# Altium PCB PCB_LED_Board_v2.0.PcbDoc
Units mil, origin at the board's own origin, x right, y up, seen from the top; angles counter-clockwise.
Board outline 1496.06 x 590.55 mil, 3 copper layers (Aluminium, Dielectric, Copper Layer), stack 124.257 mil thick; 4 components, 5 nets, 13 pads, 0 vias.
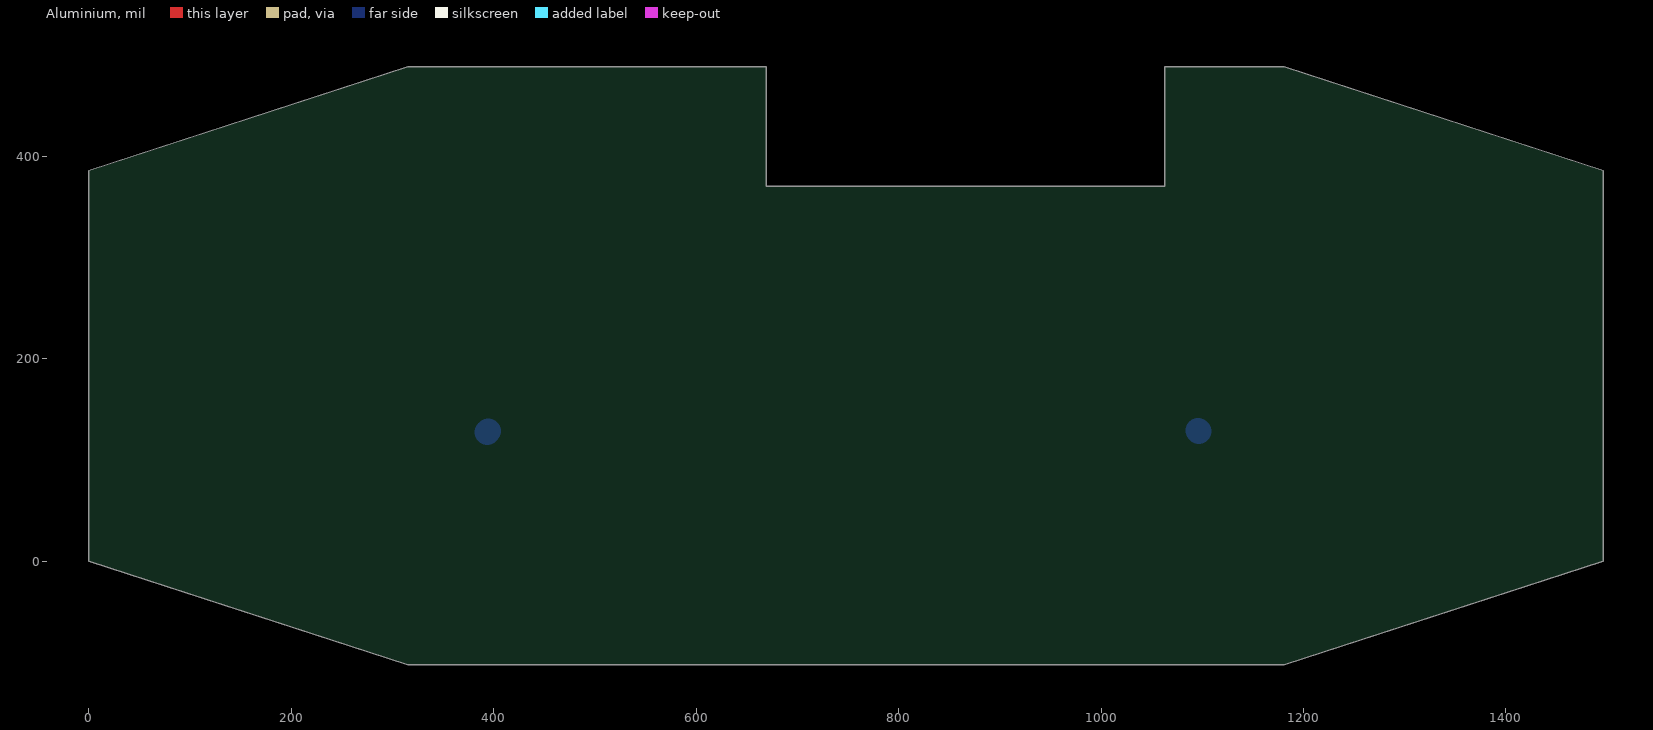
[diagram p0: Aluminium view]
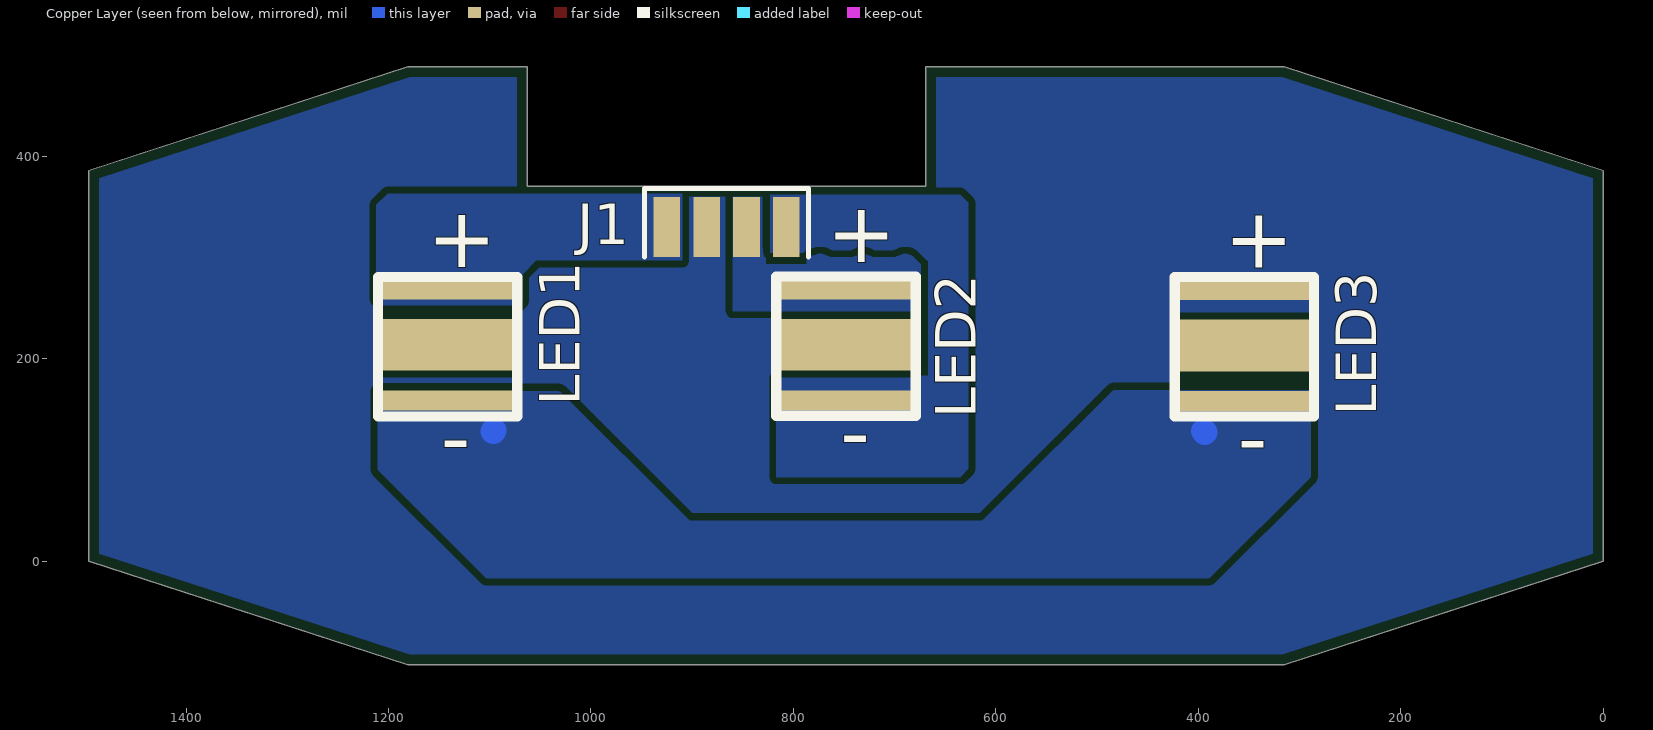
[diagram p1: Copper Layer view, seen from below]
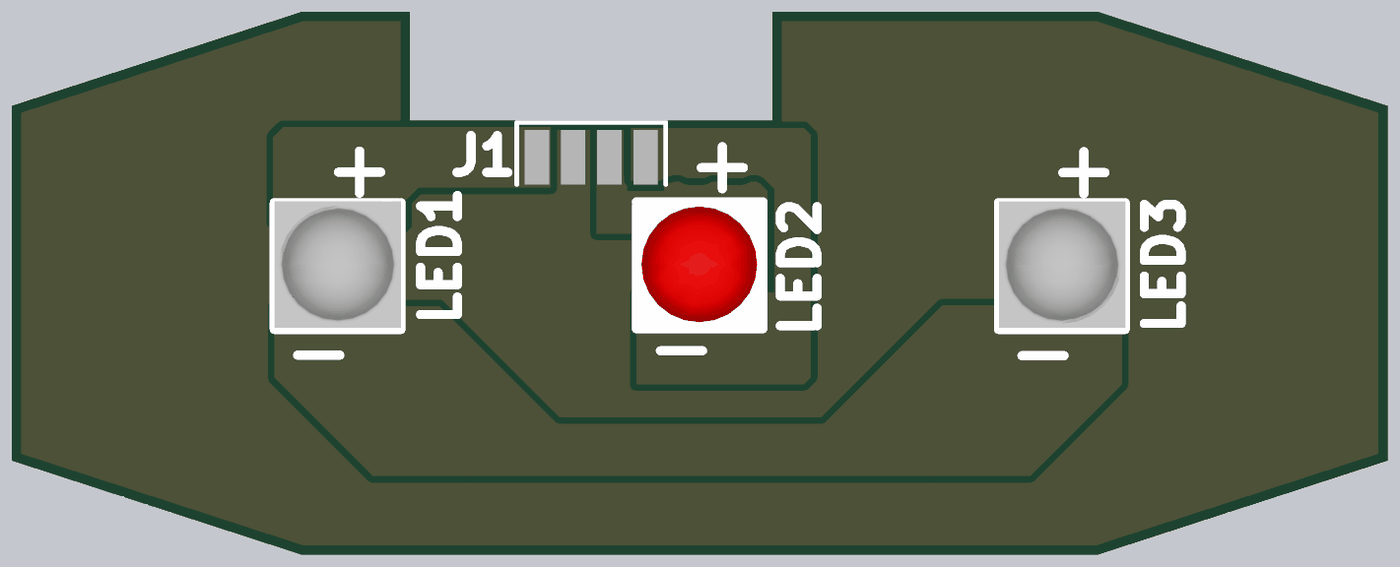
[diagram p2: 3D render of the assembled board from below, using the file's embedded part models]

## Layer stack, top to bottom
Top Solder: solder mask 0.3937, SM-001, Dk 4
Aluminium: signal copper 59.0551
Aluminium: core 59.055, FR-4, Dk 4.8
Dielectric: signal copper 1.9685
Dielectric 1: prepreg 2.8, PP-006, Dk 4.1
Copper Layer: signal copper 1.378

## Board outline
0,0 0,385.88 314.96,488.21 669.29,488.21 669.29,370.1 1062.99,370.1 1062.99,488.21 1181.1,488.21 1496.06,385.88 1496.06,0 1181.1,-102.34 314.96,-102.34

## Design rules (kind name [scope] priority, off if disabled: settings)
BoardOutlineClearance [All] p1: gap=0 ignorepadtopadclearanceinfootprint=FALSE except(10: Poly-OutlineEdge)
Clearance [All] p1: gap=7 ignorepadtopadclearanceinfootprint=FALSE
FanoutControl Fanout_Default [All] p1: bgadir=Out bgaviamode=Centered fanoutstyle=Auto fanoutdirection=Alternating viagrid=1 // Fanout_Default (Default Rule)
FanoutControl Fanout_Small [(CompPinCount < 5)] p2: bgadir=Out bgaviamode=Centered fanoutstyle=Auto fanoutdirection=OutThenIn viagrid=1 // Fanout_Small (Default Rule)
FanoutControl Fanout_LCC [IsLCC] p4: bgadir=Out bgaviamode=Centered fanoutstyle=Auto fanoutdirection=Alternating viagrid=1 // Fanout_LCC (Default Rule)
FanoutControl Fanout_BGA [IsBGA] p5: bgadir=Out bgaviamode=Centered fanoutstyle=Auto fanoutdirection=Alternating viagrid=1 // Fanout_BGA (Default Rule)
HoleSize [All] p1: absolutevalues=TRUE maxlimit=1000 minlimit=1 maxpercent=80.000 minpercent=20.000
HoleToHoleClearance [All] p1: gap=0 allowstackedmicrovias=TRUE
MinimumSolderMaskSliver [All] p1: minsoldermaskwidth=0
PlaneConnect [All] p1: planeconnectstyle=Direct reliefexpansion=20 reliefentries=4 reliefconductorwidth=10 reliefairgap=10
PolygonConnect [All] p1: connectstyle=Direct reliefconductorwidth=10 reliefentries=4 polygonreliefangle="90 Angle" airgapwidth=10
RoutingVias [All] p1: holewidth=11.81 width=23.62 viastyle="Through Hole" minholewidth=11.81 minwidth=23.62 maxholewidth=11.81 maxwidth=23.62
SilkToSilkClearance [All] p1: silktosilkclearance=0
SilkToSolderMaskClearance [IsPad] p1: minsilkscreentomaskgap=0 clearancetoexposedcopper=TRUE
SolderMaskExpansion Via [IsVia] p1: expansion=0 istentingtop=FALSE soldermaskfromhole=TRUE
SolderMaskExpansion SolderMaskExpansion_1 [Not IsVia] p2: expansion=4 istentingtop=FALSE
UnRoutedNet [All] p1: checkbadconnections=TRUE
Width [All] p1: maxlimit=100 minlimit=10 preferedwidth=15 midlayer1_maxwidth=10 midlayer1_prefwidth=10 minimp=50.000000 maximp=50.000000 favimp=50.000000
19 further rules are at their usual default settings.

## Components (designator, comment, footprint, x,y, rotation, side; value= is the part's Value field where it differs from the comment)
J1 "1mm FPC" FPC-Modified 866,335 r0 bottom
LED1 "White" LED_SPHWH2L3D30CD4QTP3 1141.55,213.54 r270 bottom locked
LED2 "RED" LED_SPHRD2L3DH20E7W41J 748.55,213.54 r270 bottom locked
LED3 "White" LED_SPHWH2L3D30CD4QTP3 354,213 r90 bottom locked

## Footprints (in the part's own frame and the unit in brackets; to place one, negate y for a bottom-side part, rotate by r counter-clockwise, add the part's x,y. Pads: shape width x height; smd on the part's side, far side on the other; paste and mask are expansions set on the pad)
FPC-Modified [mm]
  rect 0.67x1.5 smd paste+0: 1(1.5,0.127) 2(0.5,0.127) 3(-0.5,0.127) 4(-1.5,0.127)
  silkscreen extent -2.06,-0.84 2.06,0.88
LED_SPHRD2L3DH20E7W41J [mil] "LED LH351H DEEP RED 638NM"
  rect 20x130 smd paste+0 mask+0: 1(-55,0) 2(55,0)
  rect 51x130 smd paste+0 mask+0: 3(0,0)
  body extent -69,-69 69,69, height 80
LED_SPHWH2L3D30CD4QTP3 [mil] "LED Lighting LH351B White, Cool 5700K"
  rect 20x130 smd paste+0 mask+0: 1(-55,0) 2(55,0)
  rect 51x130 smd paste+0 mask+0: 3(0,0)
  body extent -69,-69 69,69, height 75

## Part data
J1: library part FPC-Modified, "1mm Pitch 4P FPC"
LED1 LED3: library part SPHWH2L3D30CD4QTP3, "LED Lighting LH351B White, Cool 5700K 2.8V 350mA 120° 1414 (3535 Metric)", Digikey Part Number=1510-2143-6-ND, Manufacturer="Samsung Semiconductor, Inc.", Package="0.138\" L x 0.138\" W (3.50mm x 3.50mm)", ComponentLink1Description="Digikey Link", ComponentLink1URL=https://www.digikey.com/en/products/detail/samsung-semiconductor-inc/SPHWH2L3D30CD4QTP3/6569391, Item Type=LED, Manufacturer Part Number=SPHWH2L3D30CD4QTP3
LED2: library part SPHRD2L3DH20E7W41J, "LED Lighting Color LH351H Red 660nm (650nm ~ 670nm)", Digikey Part Number=1510-SPHRD2L3DH20E7W41JDKR-ND, Manufacturer="Samsung Semiconductor, Inc.", Package="0.138\" L x 0.138\" W (3.50mm x 3.50mm)", ComponentLink1Description="Digikey Link", ComponentLink1URL=https://www.digikey.com/en/products/detail/samsung-semiconductor-inc/SPHRD2L3DH20E7W41J/13617167?s=N4IgTCBcDaIMoAUASAlAImAMgZjUsADAKIDsA6gCwCMAUiALoC%2BQA, Item Type=LED, Manufacturer Part Number=SPHRD2L3DH20E7W41J

## Nets (pads, with @x,y where several pads share a name; then routed paths per layer and width w, separated by ;. In a path a pad name is that pad's centre, name@x,y a point inside that pad or via, vN(x,y) a via of type N, cw(c..) or ccw(c..) an arc to the next point about the centre after c; other vN are vias at no path point)
+3V3: J1.3 LED2.1
LED_R_NEG: J1.4 LED2.2
LED_W_NEG: J1.2 LED3.2
LED_W_POS: J1.1 LED1.1
NetLED1_2: LED1.2 LED3.1 | length 2.9
  Copper Layer w25: 393.47,127.32 394.65,128.5 ; 1095.83,129.04 1096.68,128.19
pads on no net: LED1.3 LED2.3 LED3.3

## Polygon pours and split planes (outlines as drawn)
NetLED1_2 on Copper Layer "NETLED1_2_L03_P006" (solid, remove dead copper, pour order 6): 289,169 484,169 595,58 921,58 1030.96,167.96 1210.63,167.96 1210.63,90 1082.63,-38 410,-38 289,83
LED_W_POS on Copper Layer "LED_W_POS_L03_P011" (solid, remove dead copper, pour order 11): 910,363 910,297 1054,297 1068,283 1068,257 1072,253 1206,253 1212,259 1212,352 1201,363 997,363
LED_R_NEG on Copper Layer "LED_R_NEG_L03_P008" (solid, remove dead copper, pour order 8): 784.06,304.59 784.06,307.09 753.04,307.09 678,307.09 667,296.09 667,183.1 816.93,183.1 816.93,83 668,83 647,83 635,83 627,91 627,354 635,362 823,362 823,304.59
+3V3 on Copper Layer "+3V3_L03_P012" (solid, remove dead copper, pour order 12): 678,307.09 673.46,302.55 673.46,247 860,247 860,360 831,360 831,310 828.09,307.09
LED_W_NEG on Copper Layer "LED_W_NEG_L03_P000" (solid, remove dead copper, pour order 0): 0,385.88 314.96,488.21 669.29,488.21 669.59,487.91 669.59,370.1 1062.97,370.1 1062.99,370.13 1062.99,488.21 1181.1,488.21 1496.06,385.88 1496,305 1496.06,0 1181.1,-102.34 992,-102 314.96,-102.34 0,0

## Silkscreen, mask and mechanical layers (free items; w line width, h text height)
Bottom Overlay:
  lines w10: 285.43,142.73 423.23,142.73 423.23,280.52 285.43,280.52 285.43,142.73 ; 679.13,143.54 816.93,143.54 816.93,281.34 679.13,281.34 679.13,143.54 ; 1072.83,142.73 1072.83,280.52 1210.63,280.52 1210.63,142.73 1072.83,142.73
  text "+" at 767.2,295.29 h60
  text "+" at 1161.65,290.49 h60
  text "+" at 374.1,289.95 h60
  text "-" at 724.17,142.87 h60 r180
  text "-" at 331.07,137.53 h60 r180
  text "-" at 1118.61,138.07 h60 r180
Dimensions:
  circle w10: c748.03,192.94 r9.84
  circle w10: c748.03,192.94 r9.84
  lines w10: 0,122.46 204.72,122.46 204.72,-66.52 ; 0,263.42 204.72,263.42 204.72,452.4 ; 1291.34,-66.52 1291.34,122.46 1496.06,122.46 ; 1291.34,452.4 1291.34,263.42 1496.06,263.42 ; 285.43,143.73 285.43,212.62 ; 285.43,143.73 285.43,212.62 ; 285.43,143.73 333.89,143.73 ; 285.43,143.73 333.89,143.73 ; 285.43,212.62 287.57,212.62 ; 285.43,212.62 285.43,233.06 ; 285.43,212.62 287.57,212.62 ; 285.43,212.62 285.43,233.06 ; 285.43,233.06 cw(c354.33,212.62) 333.89,281.52 ; 285.43,233.06 cw(c354.33,212.62) 333.89,281.52 ; 285.43,233.06 285.43,281.52 ; 285.43,233.06 285.43,281.52 ; 285.43,281.52 333.89,281.52 ; 285.43,281.52 333.89,281.52 ; 287.57,212.62 ccw(c354.33,212.62) 354.33,279.38 ; 287.57,212.62 ccw(c354.33,212.62) 354.33,279.38 ; 333.89,143.73 cw(c354.33,212.62) 285.43,192.19 ccw(c354.33,212.62) 333.89,143.73 ; 333.89,143.73 374.77,143.73 ; 333.89,143.73 374.77,143.73 ; 333.89,281.52 374.77,281.52 ; 333.89,281.52 374.77,281.52 ; 354.33,279.38 354.33,145.86 354.33,279.38 ; 374.77,143.73 ccw(c354.33,212.62) 423.23,192.19 ; 374.77,143.73 ccw(c354.33,212.62) 423.23,192.19 ; 374.77,143.73 423.23,143.73 ; 374.77,143.73 423.23,143.73 ; 374.77,281.52 cw(c354.33,212.62) 423.23,233.06 ccw(c354.33,212.62) 374.77,281.52 ; 374.77,281.52 423.23,281.52 ; 374.77,281.52 423.23,281.52 ; 423.23,143.73 423.23,192.19 ; 423.23,143.73 423.23,192.19 ; 423.23,192.19 423.23,212.62 ; 423.23,192.19 423.23,212.62 ; 423.23,212.62 423.23,281.52 ; 423.23,212.62 423.23,281.52 ; 423.23,212.62 421.09,212.62 423.23,212.62 ; 679.13,143.73 816.93,143.73 ; 679.13,143.73 816.93,143.73 ; 679.13,143.73 679.13,281.52 ; 679.13,143.73 679.13,281.52 ; 679.13,281.52 816.93,281.52 ; 679.13,281.52 816.93,281.52 ; 748.03,143.75 cw(c748.03,212.62) 748.03,281.49 ; 748.03,143.75 cw(c748.03,212.62) 748.03,281.49 ; 748.03,143.75 748.03,281.49 ; 748.03,143.75 748.03,281.49 ; 816.93,143.73 816.93,281.52 ; 816.93,143.73 816.93,281.52 ; 1072.83,143.73 1121.29,143.73 ; 1072.83,143.73 1072.83,212.62 ; 1072.83,143.73 1072.83,212.62 ; 1072.83,143.73 1121.29,143.73 ; 1072.83,212.62 1074.97,212.62 ; 1072.83,212.62 1074.97,212.62 ; 1072.83,212.62 1072.83,233.06 ; 1072.83,212.62 1072.83,233.06 ; 1072.83,233.06 cw(c1141.73,212.62) 1121.29,281.52 ; 1072.83,233.06 cw(c1141.73,212.62) 1121.29,281.52 ; 1072.83,233.06 1072.83,281.52 ; 1072.83,233.06 1072.83,281.52 ; 1072.83,281.52 1121.29,281.52 ; 1072.83,281.52 1121.29,281.52 ; 1074.97,212.62 ccw(c1141.73,212.62) 1141.73,279.38 ; 1074.97,212.62 ccw(c1141.73,212.62) 1141.73,279.38 ; 1121.29,143.73 cw(c1141.73,212.62) 1072.83,192.19 ccw(c1141.73,212.62) 1121.29,143.73 ; 1121.29,143.73 1162.17,143.73 ; 1121.29,143.73 1162.17,143.73 ; 1121.29,281.52 1162.17,281.52 ; 1121.29,281.52 1162.17,281.52 ; 1141.73,279.38 1141.73,145.86 1141.73,279.38 ; 1162.17,143.73 ccw(c1141.73,212.62) 1210.63,192.19 ; 1162.17,143.73 ccw(c1141.73,212.62) 1210.63,192.19 ; 1162.17,143.73 1210.63,143.73 ; 1162.17,143.73 1210.63,143.73 ; 1162.17,281.52 cw(c1141.73,212.62) 1210.63,233.06 ccw(c1141.73,212.62) 1162.17,281.52 ; 1162.17,281.52 1210.63,281.52 ; 1162.17,281.52 1210.63,281.52 ; 1210.63,143.73 1210.63,192.19 ; 1210.63,143.73 1210.63,192.19 ; 1210.63,192.19 1210.63,212.62 ; 1210.63,192.19 1210.63,212.62 ; 1210.63,212.62 1208.49,212.62 1210.63,212.62 ; 1210.63,212.62 1210.63,281.52 ; 1210.63,212.62 1210.63,281.52 ; 0,0 0,385.88 314.96,488.21 669.29,488.21 669.29,370.1 1063,370.1 1062.99,488.21 1181.1,488.21 1496.06,385.88 1496.06,0 1181.1,-102.34 314.96,-102.34 0,0 ; 748.03,145.72 ccw(c748.03,212.62) 748.03,279.53 cw(c748.03,212.62) 748.03,145.72
Board Shape:
  the board outline again, w10

## Dimensions
1496.06,385.88 to 0,385.88 on Dimensions
1181.1,488.21 to 1181.1,-102.34 on Dimensions
1496.06,385.88 to 1496.06,0 on Dimensions
669.29,370.1 to 1062.99,488.21 on Dimensions